# Altium PCB 1700-0003_PowerBoard_REV-A.PcbDoc (part 1 of 2)
Units mil, origin at the board's own origin, x right, y up, seen from the top; angles counter-clockwise.
Board outline 4000 x 3250 mil, 4 copper layers (Top, GND+Signal, PWR+Signal, Bottom), stack 69.687 mil thick; 205 components, 103 nets, 571 pads, 228 vias.
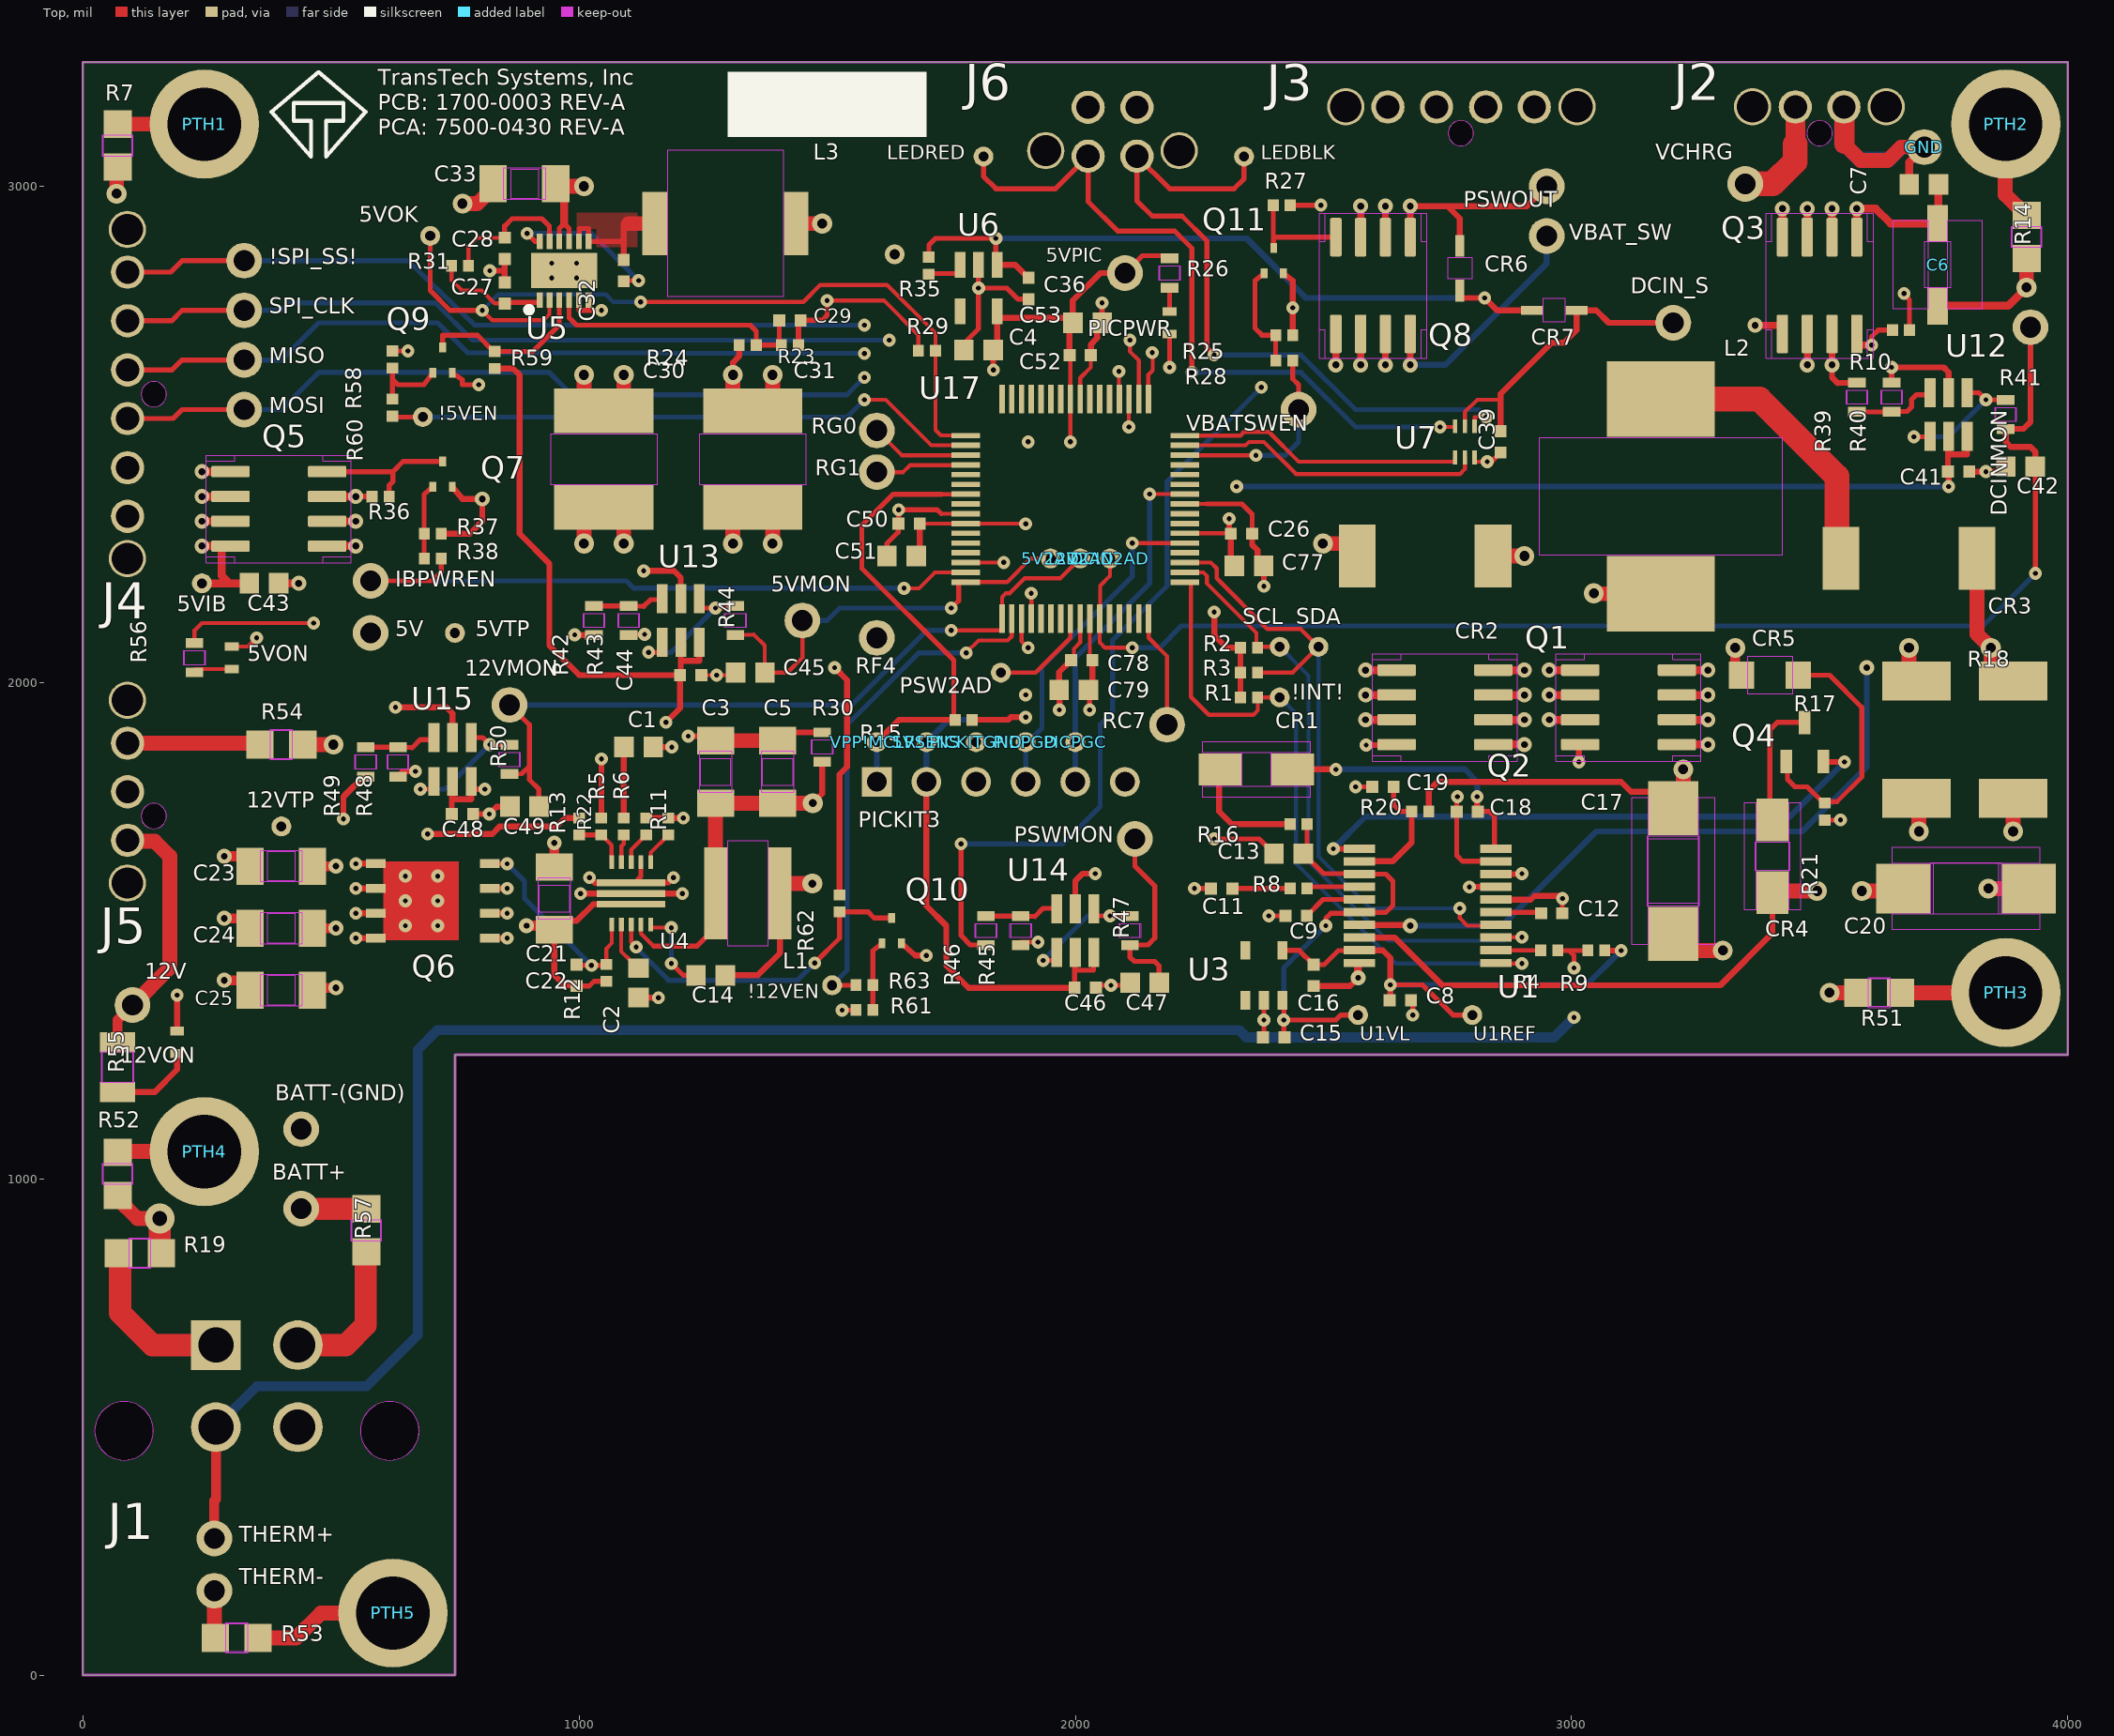
[diagram p0: Top view]
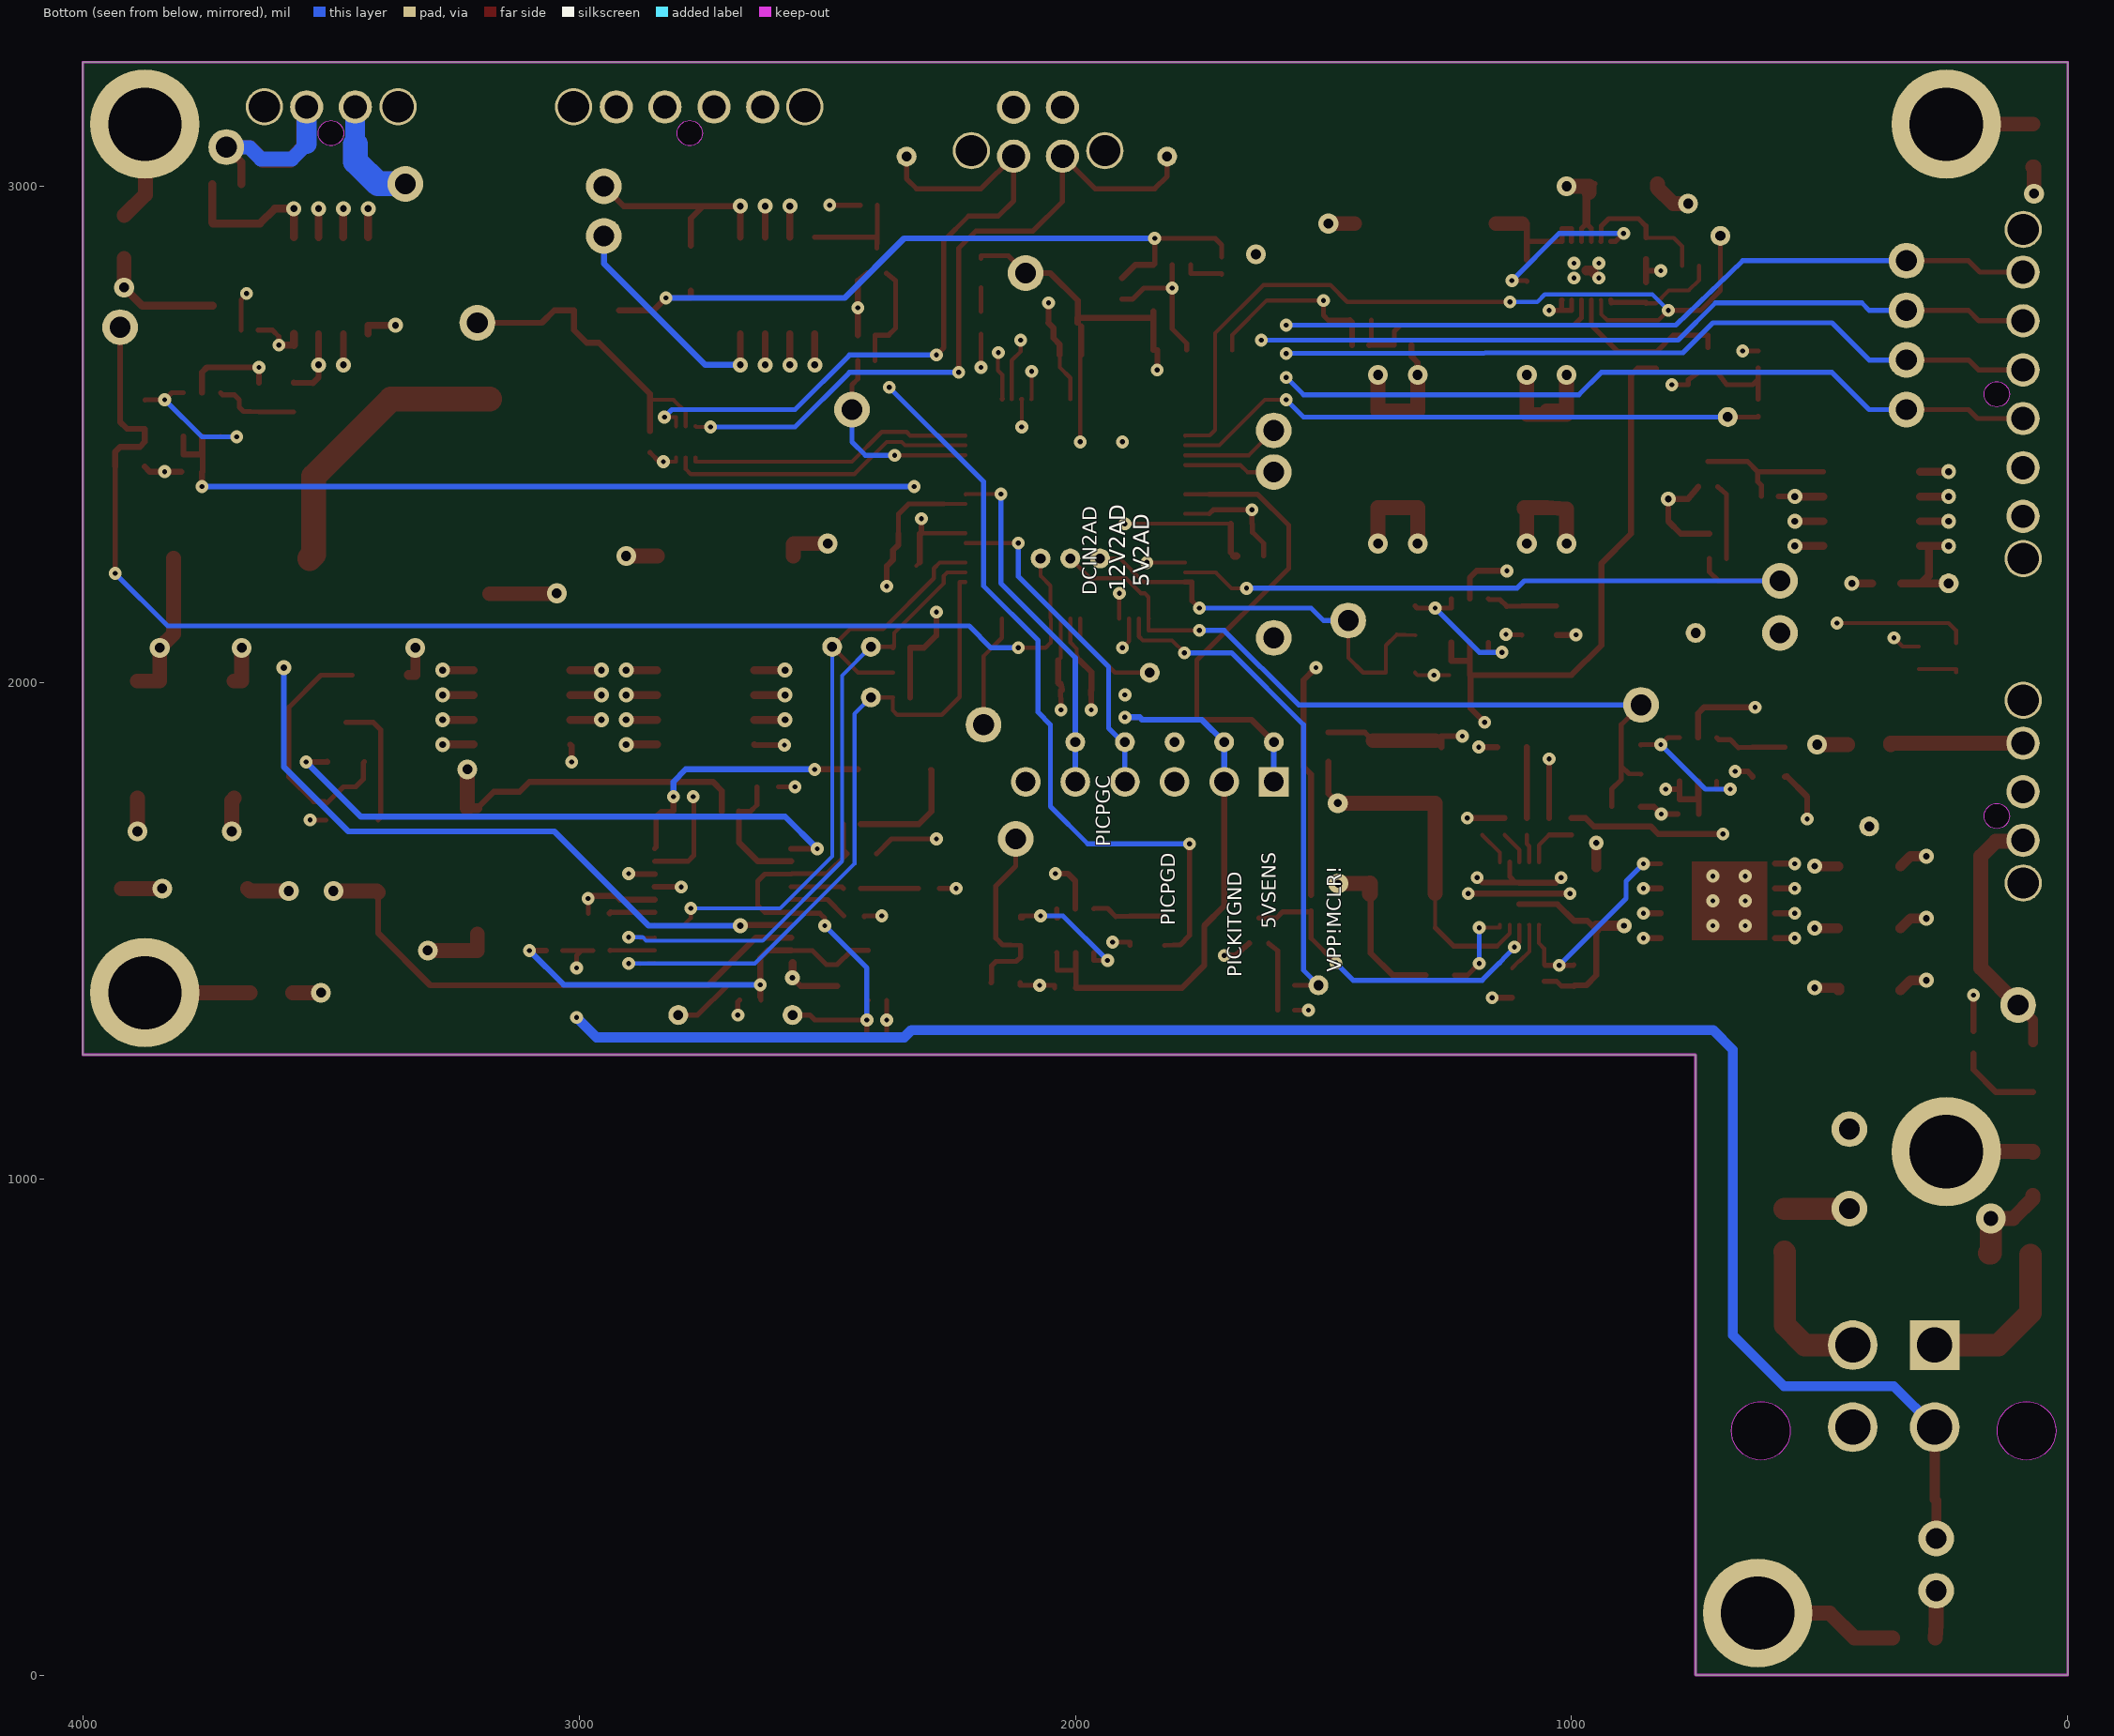
[diagram p1: Bottom view, seen from below]
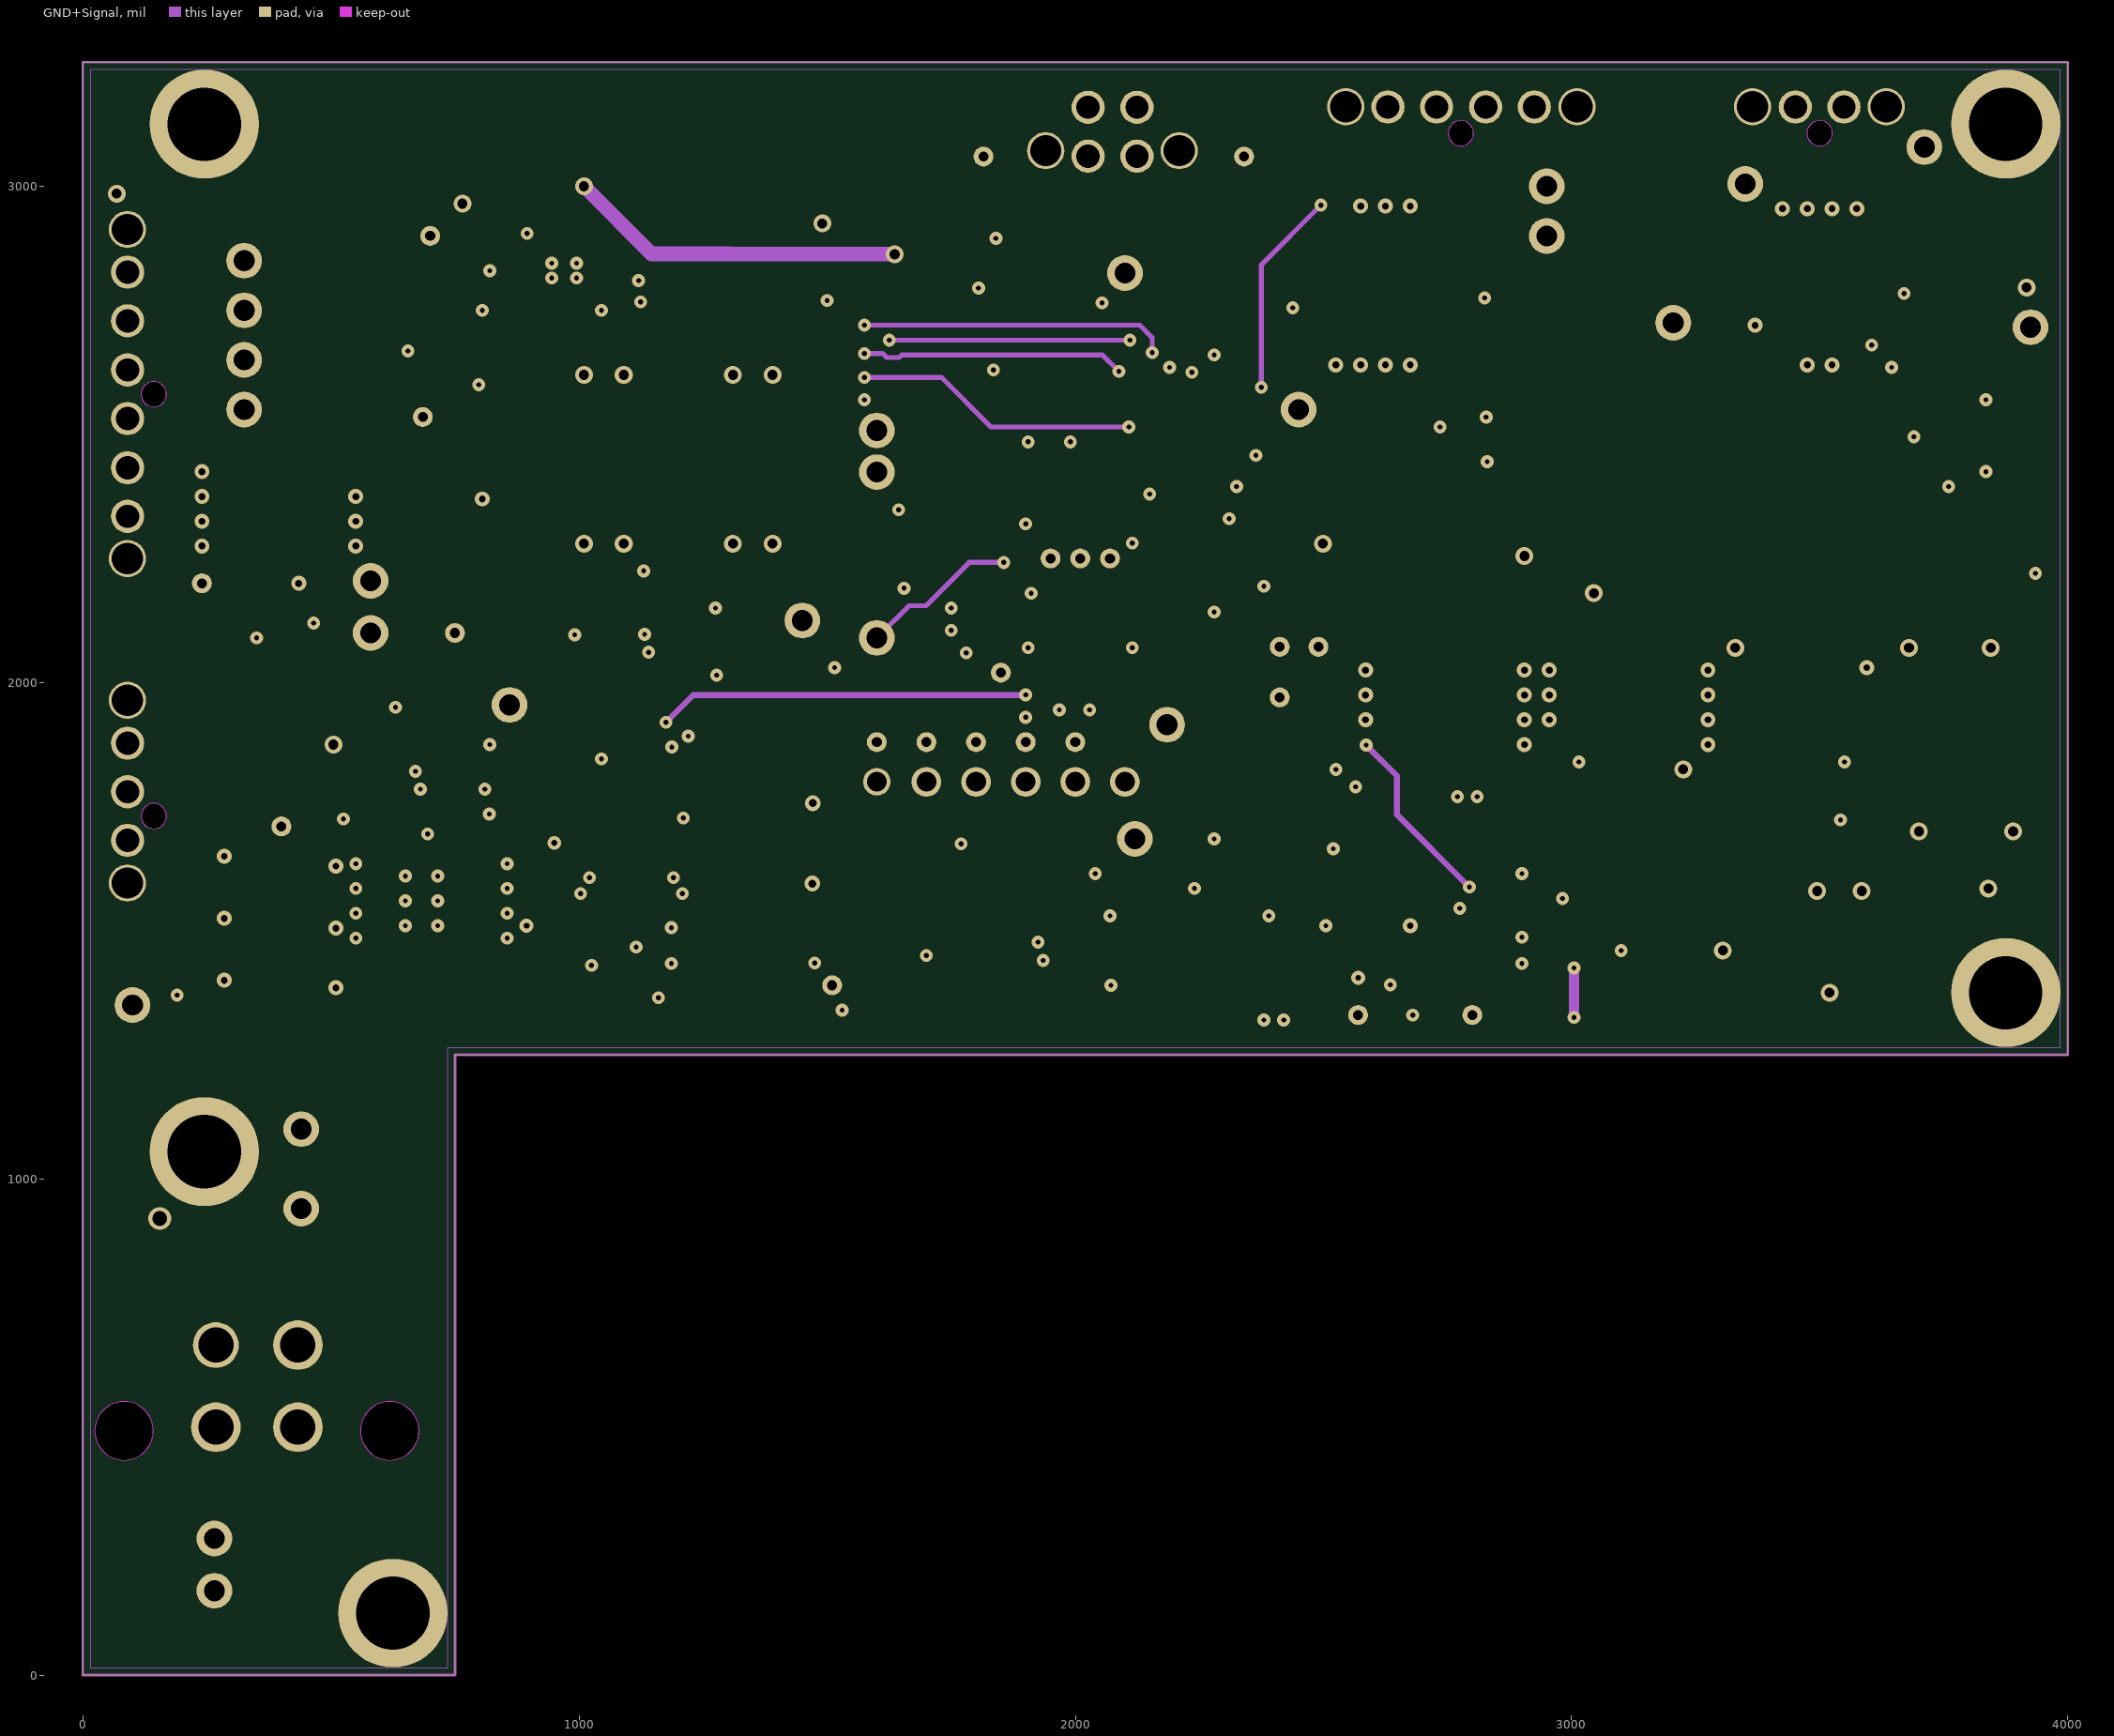
[diagram p2: GND+Signal]
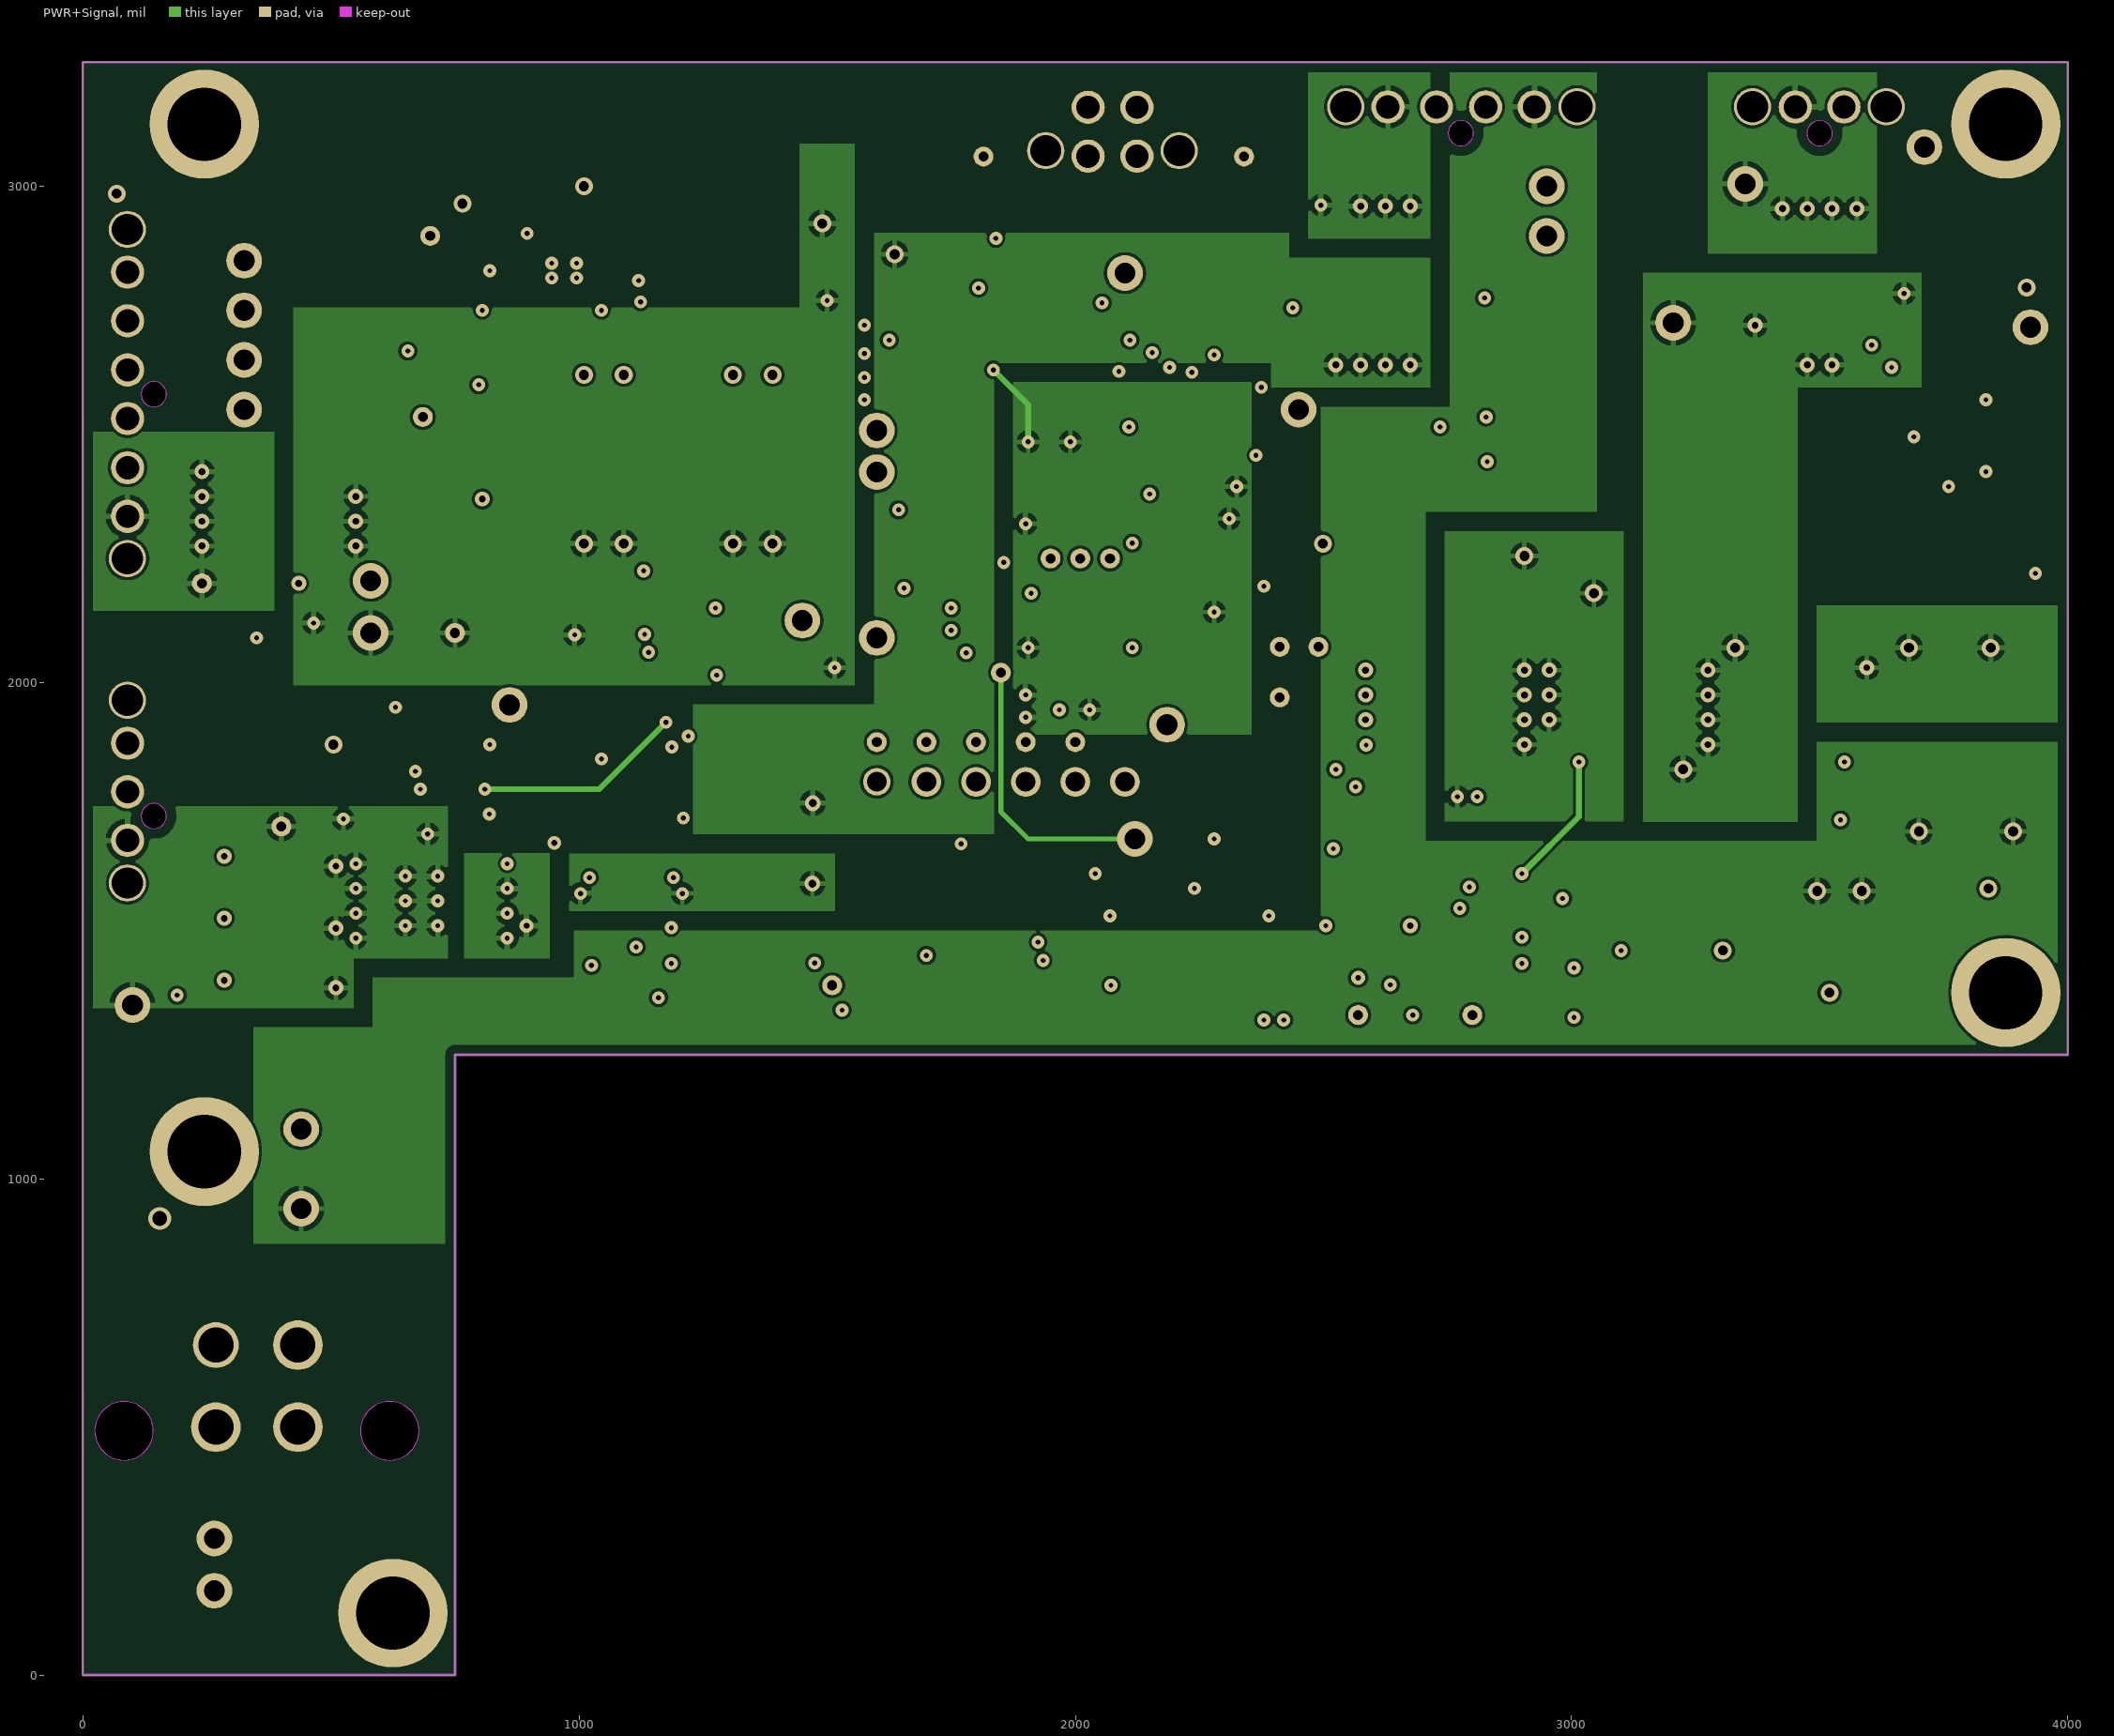
[diagram p3: PWR+Signal]

## Layer stack, top to bottom
Top Solder: solder mask 0.4, Solder Resist, Dk 3.5
Top: signal copper 1.378
Dielectric 1: core 4.3307, FR-4, Dk 4.8
GND+Signal: signal copper 1.378
Dielectric2: prepreg 47.2441, FR-4, Dk 4.8
PWR+Signal: signal copper 1.378
Dielectric3: dielectric 12.6, FR-4, Dk 4.8
Bottom: signal copper 1.378
Bottom Solder: solder mask 0.4, Solder Resist, Dk 3.5

## Board outline
0,0 750,0 750,1250 4000,1250 4000,3250 0,3250
cut-out: 82.96,433.07 ccw(c82.96,492.13) 142.01,492.13 ccw(c82.96,492.13) 82.96,551.18 ccw(c82.96,492.13) 23.91,492.13 ccw(c82.96,492.13)
cut-out: 618.39,433.07 ccw(c618.39,492.13) 677.45,492.13 ccw(c618.39,492.13) 618.39,551.18 ccw(c618.39,492.13) 559.34,492.13 ccw(c618.39,492.13)
cut-out: 143,1705.5 ccw(c143,1731) 168.5,1731 ccw(c143,1731) 143,1756.5 ccw(c143,1731) 117.5,1731 ccw(c143,1731)
cut-out: 2777,3081.5 ccw(c2777,3107) 2802.5,3107 ccw(c2777,3107) 2777,3132.5 ccw(c2777,3107) 2751.5,3107 ccw(c2777,3107)
cut-out: 143,2555.5 ccw(c143,2581) 168.5,2581 ccw(c143,2581) 143,2606.5 ccw(c143,2581) 117.5,2581 ccw(c143,2581)
cut-out: 3500,3081.5 ccw(c3500,3107) 3525.5,3107 ccw(c3500,3107) 3500,3132.5 ccw(c3500,3107) 3474.5,3107 ccw(c3500,3107)

## Design rules (kind name [scope] priority, off if disabled: settings)
BoardOutlineClearance mdCopperDimension [All] p1: gap=10 ignorepadtopadclearanceinfootprint=FALSE except(0: Arc-SplitContinuation Track-SplitContinuation SMDPad-SplitContinuation THPad-SplitContinuation Via-SplitContinuation Fill-SplitContinuation Poly-SplitContinuation Region-SplitContinuation Text-SplitContinuation; 20: Poly-OutlineEdge Poly-CavityEdge Poly-CutoutEdge Poly-SplitBarrior)
Clearance Clearance_for_PolygonClass_Isolate_2 [InPolygonClass('Isolate_2') vs IsArc Or IsTrack Or IsPad Or IsVia Or IsFill Or IsRegion Or IsText] p1: gap=2 ignorepadtopadclearanceinfootprint=FALSE
Clearance "Clearance (Same Net)" [All] p2: gap=6 ignorepadtopadclearanceinfootprint=FALSE
Clearance [All] p3: gap=6 ignorepadtopadclearanceinfootprint=FALSE
HoleSize [All] p1: absolutevalues=TRUE maxlimit=100000 minlimit=8 maxpercent=80.000 minpercent=20.000
HoleToHoleClearance mdDrill [All] p1: gap=10 allowstackedmicrovias=TRUE
MinimumSolderMaskSliver [All] p1 off: minsoldermaskwidth=10
PasteMaskExpansion Expansion_SMDPaste_OFF [InPadClass('SMDPaste_OFF')] p1: expansion=0
PasteMaskExpansion mlMinCreamFrame [All] p2: expansion=0
PolygonConnect PolygonConnect_For_PolygonThermal_ON_Width110000_Gap100000 [InPolygonClass('PolygonThermal_ON_Width110000_Gap100000')] p1: connectstyle=Relief reliefconductorwidth=11 reliefentries=4 polygonreliefangle="90 Angle" airgapwidth=10
PolygonConnect PolygonConnect_For_PolygonThermal_ON_Width120000_Gap100000 [InPolygonClass('PolygonThermal_ON_Width120000_Gap100000')] p2: connectstyle=Relief reliefconductorwidth=12 reliefentries=4 polygonreliefangle="90 Angle" airgapwidth=10
PolygonConnect PolygonConnect_For_PolygonThermal_ON_Width40000_Gap100000 [InPolygonClass('PolygonThermal_ON_Width40000_Gap100000')] p3: connectstyle=Relief reliefconductorwidth=4 reliefentries=4 polygonreliefangle="90 Angle" airgapwidth=10
PolygonConnect PolygonConnect_For_PolygonThermal_ON_Width100000_Gap100000 [InPolygonClass('PolygonThermal_ON_Width100000_Gap100000')] p4: connectstyle=Relief reliefconductorwidth=10 reliefentries=4 polygonreliefangle="90 Angle" airgapwidth=10
PolygonConnect ThermalVias [IsVia] p5: connectstyle=Relief reliefconductorwidth=10 reliefentries=4 polygonreliefangle="90 Angle" airgapwidth=10
PolygonConnect [All] p6: connectstyle=Relief reliefconductorwidth=10 reliefentries=4 polygonreliefangle="90 Angle" airgapwidth=10
RoutingVias [All] p1: holewidth=8 width=24 viastyle="Through Hole" minholewidth=8 minwidth=24 maxholewidth=100 maxwidth=100
SolderMaskExpansion mlMinStopFrame [All] p1: expansion=2 istentingtop=FALSE
Width [All] p1: maxlimit=10 minlimit=6 preferedwidth=6
26 further rules are at their usual default settings.

## Classes and differential pairs
polygon class PolygonThermal_ON_Width110000_Gap100000: Polygon_1_Net_5V Polygon_1_Net_BATT+ Polygon_1_Net_DCIN_S Polygon_1_Net_IB_PWR_5V Polygon_1_Net_PC_PWR_12V Polygon_1_Net_PSW_OUT Polygon_1_Net_U1_CS Polygon_1_Net_V_CHRGR Polygon_1_Net_VBAT_SW
polygon class PolygonThermal_ON_Width120000_Gap100000: Polygon_1_Net_VOUT_BOOST
polygon class PolygonThermal_ON_Width40000_Gap100000: Polygon_1_Net_PHASE1-2
polygon class PolygonThermal_ON_Width100000_Gap100000: Polygon_1_Net_5VPIC Polygon_1_Net_GND Polygon_1_Net_L1_OUT Polygon_1_Net_U1_LX
polygon class Isolate_2: Polygon_1_Net_GND
pad class SMDPaste_OFF: U4-6 U4-7 U4-8

## Components (designator, comment, footprint, x,y, rotation, side; value= is the part's Value field where it differs from the comment)
5V "" TST_POINT_PTH_042-OCT 580,2100 r0 top
5V2AD "" TST_POINT_PTH_20X40MIL 1950,2250 r0 top
5VIB "" TST_POINT_PTH_20X40MIL 240,2200 r0 top
5VMON "" TST_POINT_PTH_042-OCT 1450,2125 r0 top
5VOK "" TST_POINT_PTH_20X40MIL_2PIN 700,2900 r0 top
5VON "" LED_DIALIGHT_598_DIA 300,2050 r270 top
5VPIC "" TST_POINT_PTH_042-OCT 2100,2825 r0 top
5VSENS "" TST_POINT_PTH_20X40MIL_2PIN 1700,1880 r90 top
5VTP "" TST_POINT_PTH_20X40MIL 750,2100 r0 top
12V "" TST_POINT_PTH_042-OCT 100,1350 r0 top
12V2AD "" TST_POINT_PTH_20X40MIL 2010,2250 r0 top
12VMON "" TST_POINT_PTH_042-OCT 860,1955 r0 top
12VON "" LED_DIALIGHT_598_DIA 190,1275 r270 top
12VTP "" TST_POINT_PTH_20X40MIL 400,1710 r0 top
!5VEN "" TST_POINT_PTH_20X40MIL_2PIN 685,2535 r0 top
!12VEN "" TST_POINT_PTH_20X40MIL 1510,1390 r0 top
!INT! "" TST_POINT_PTH_20X40MIL_2PIN 2412,1970 r0 top
!SPI_SS! "" TST_POINT_PTH_042-OCT_2PIN 325,2850 r0 top
BATT+ "" TST_POINT_PTH_042-OCT 440,940 r0 top
BATT-(GND) "" TST_POINT_PTH_042-OCT 440,1100 r0 top
C1 "" CAP_C1608_TDK 1120,1870 r0 top
C2 "" CAP_C1608_TDK 1120,1395 r270 top
C3 "" CAP_CL31_SAM 1275,1820 r90 top
C4 "" CAP_C1608_TDK 1805,2670 r180 top
C5 "" CAP_CL31_SAM 1400,1820 r90 top
C6 "" CAP_AFK106M25B12T-F_CND-L 3738,2842 r270 top
C7 "" CAP_C1608_TDK 3710,3004 r180 top
C8 "" G-155_MUR 2655,1360 r0 top
C9 "" G-155_MUR 2445,1530 r180 top
C11 "" G-155_MUR 2295,1585 r180 top
C12 "" G-155_MUR 2960,1535 r0 top
C13 "" CAP_C1608_TDK 2430,1655 r180 top
C14 "" CAP_C1608_TDK 1265,1410 r180 top
C15 "" G-155_MUR 2400,1285 r180 top
C16 "" G-155_MUR 2480,1410 r270 top
C17 "" CAPMP7.6X4.3_3.1N_KEM 3205,1620 r270 top
C18 "" G-155_MUR 2790,1740 r180 top
C19 "" G-155_MUR 2620,1790 r180 top
C20 "" CAPMP7.6X4.3_3.1N_KEM 3795,1585 r0 top
C21 "" CAP_CL31_SAM 950,1565 r90 top
C22 "" G-155_MUR 995,1410 r90 top
C23 "" CAP_CL31_SAM 400,1630 r180 top
C24 "" CAP_CL31_SAM 400,1505 r180 top
C25 "" CAP_CL31_SAM 400,1380 r180 top
C26 "" G-155_MUR 2335,2300 r0 top
C27 "" G-155_MUR 850,2785 r90 top
C28 "" G-155_MUR 850,2875 r270 top
C29 "" G-155_MUR 1425,2730 r180 top
C30 "" CAP_CKG57N_TDK 1050,2450 r90 top
C31 "" CAP_CKG57N_TDK 1350,2450 r90 top
C32 "" G-155_MUR 1090,2830 r270 top
C33 "" CAP_CL31_SAM 890,3005 r180 top
C36 "" G-155_MUR 1906,2794 r270 top
C39 "" G-155_MUR 2857,2485 r270 top
C41 "" G-155_MUR 3780,2425 r0 top
C42 "" CAP_C1608_TDK 3905,2435 r180 top
C43 "" CAP_C1608_TDK 365,2200 r0 top
C44 "" G-155_MUR 1225,2015 r0 top
C45 "" CAP_C1608_TDK 1345,2020 r180 top
C46 "" G-155_MUR 2020,1385 r0 top
C47 "" CAP_C1608_TDK 2140,1395 r180 top
C48 "" G-155_MUR 765,1735 r0 top
C49 "" CAP_C1608_TDK 890,1750 r180 top
C50 "" G-155_MUR 1665,2320 r180 top
C51 "" CAP_C1608_TDK 1650,2255 r180 top
C52 "" G-155_MUR 2010,2660 r0 top
C53 "" CAP_C1608_TDK 2025,2725 r0 top
C77 "" CAP_C1608_TDK 2350,2235 r0 top
C78 "" G-155_MUR 2013,2045 r180 top
C79 "" CAP_C1608_TDK 1997,1985 r180 top
CR1 "" SMA_DIO 2365,1825 r180 top
CR2 "" CR_0CQ-13-F_DIO 2705,2255 r0 top
CR3 "" CR_0CQ-13-F_DIO 3680,2250 r0 top
CR4 "" SMA_DIO 3405,1650 r90 top
CR5 "" DIO_BZD27C4V3P_VIS 3400,2015 r180 top
CR6 "" USC_TOS 2775,2835 r90 top
CR7 "" USC_TOS 2965,2750 r0 top
DCIN2AD "" TST_POINT_PTH_20X40MIL 2070,2250 r0 top
DCIN_S "" TST_POINT_PTH_042-OCT 3205,2725 r0 top
DCINMON "" TST_POINT_PTH_042-OCT 3925,2716 r0 top
GND "" TST_POINT_PTH_042-OCT 3711,3079 r0 top
IBPWREN "" TST_POINT_PTH_042-OCT 580,2205 r0 top
J1 "" MOLEX_462075004 268,665 r180 top
J2 "" CON_1053111302_MOL 3500,3160 r0 top
J3 "" CON_1053111304_MOL 2630,3160 r0 top
J4 "" CON_1053111206_MOL 90,2335 r90 top
J5 "" CON_1053111303_MOL 90,1780 r90 top
J6 "" CON_1053121304 2075,3110 r0 top
L1 "" IND_XAL50XX_COC 1340,1575 r180 top
L2 "" DR127 3180,2375 r90 top
L3 "" IND_CB_DRA74 1295,2925 r180 top
LEDBLK "" TST_POINT_PTH_20X40MIL 2340,3060 r0 top
LEDRED "" TST_POINT_PTH_20X40MIL 1815,3060 r0 top
MISO "" TST_POINT_PTH_042-OCT_2PIN 325,2650 r0 top
MOSI "" TST_POINT_PTH_042-OCT_2PIN 325,2550 r0 top
PICKIT3 "" CON6_1X6_VERT-HDR 1850,1800 r0 top
PICKITGND "" TST_POINT_PTH_20X40MIL_2PIN 1800,1880 r90 top
PICPGC "" TST_POINT_PTH_20X40MIL_2PIN 2000,1880 r90 top
PICPGD "" TST_POINT_PTH_20X40MIL_2PIN 1900,1880 r90 top
PICPWR "" LED_DIALIGHT_598_DIA 2190,2725 r90 top
PSW2AD "" TST_POINT_PTH_20X40MIL 1850,2020 r0 top
PSWMON "" TST_POINT_PTH_042-OCT 2120,1685 r0 top
PSWOUT "" TST_POINT_PTH_042-OCT 2950,3000 r180 top
PTH1 "" PTH_4-40 245,3125 r0 top
PTH2 "" PTH_4-40 3875,3125 r0 top
PTH3 "" PTH_4-40 3875,1375 r0 top
PTH4 "" PTH_4-40 245,1055 r0 top
PTH5 "" PTH_4-40 625,125 r0 top
Q1 "" SOIC127P600X175-8N 3115,1950 r0 top
Q2 "" SOIC127P600X175-8N 2745,1950 r0 top
Q3 "" SOIC127P600X175-8N 3500,2800 r90 top
Q4 "" SOT-23-3_DIOTEC 3470,1880 r0 top
Q5 "" SOIC127P600X175-8N 395,2350 r180 top
Q6 "" SON8_SI7135DP-T1-GE3_VIS 705,1560 r180 top
Q7 "" SC-75(SOT-416)_ONSEMI 725,2420 r0 top
Q8 "" SOIC127P600X175-8N 2600,2800 r270 top
Q9 "" SC-75(SOT-416)_ONSEMI 725,2650 r0 top
Q10 "" SC-75(SOT-416)_ONSEMI 1630,1500 r0 top
Q11 "" SC-75(SOT-416)_ONSEMI 2400,2850 r0 top
R1 "" RESC1005X35N 2350,1970 r0 top
R2 "" RESC1005X35N 2350,2070 r0 top
R3 "" RESC1005X35N 2350,2020 r0 top
R4 "" RESC1005X35N 2955,1460 r180 top
R5 "" RESC1005X35N 1090,1710 r90 top
R6 "" RESC1005X35N 1135,1710 r90 top
R7 "" STA_HCJ0805_STP 70,3082 r270 top
R8 "" RESC1005X35N 2450,1585 r0 top
R9 "" RESC1005X35N 3050,1460 r180 top
R10 "" RESC1005X35N 3664,2710 r0 top
R11 "" RESC1005X35N 1180,1710 r90 top
R12 "" RESC1005X35N 1055,1415 r90 top
R13 "" RESC1005X35N 1000,1710 r270 top
R14 "" STA_HCJ0805_STP 3917,2898 r270 top
R15 "" RESC1005X35N 1775,1925 r180 top
R16 "" RESC1005X35N 2450,1715 r180 top
R17 "" RES_2512_TECONN 3695,1885 r270 top
R18 "" RES_2512_TECONN 3890,1885 r270 top
R19 "" STA_HCJ0805_STP 115,850 r180 top
R20 "" RESC1005X35N 2695,1740 r0 top
R21 "" RESC1005X35N 3510,1740 r270 top
R22 "" RESC1005X35N 1045,1710 r90 top
R23 "" RESC1005X35N 1425,2680 r180 top
R24 "" RESC1005X35N 1340,2680 r180 top
R25 "" RESC1005X35N 2421,2700 r180 top
R26 "" STA_RMCF0603_STP 2190,2825 r90 top
R27 "" RESC1005X35N 2416,2962 r0 top
R28 "" RESC1005X35N 2421,2649 r180 top
R29 "" RESC1005X35N 1701,2669 r0 top
R30 "" STA_RMCF0603_STP 1490,1870 r90 top
R31 "" RESC1005X35N 760,2840 r180 top
R35 "" RESC1005X35N 1705,2840 r90 top
R36 "" RESC1005X35N 600,2375 r180 top
R37 "" RESC1005X35N 705,2300 r180 top
R38 "" RESC1005X35N 705,2250 r180 top
R39 "" STA_RMCF0603_STP 3575,2575 r270 top
R40 "" STA_RMCF0603_STP 3645,2575 r90 top
R41 "" STA_RMCF0603_STP 3875,2540 r270 top
R42 "" STA_RMCF0603_STP 1030,2125 r90 top
R43 "" STA_RMCF0603_STP 1100,2125 r270 top
R44 "" STA_RMCF0603_STP 1315,2125 r270 top
R45 "" STA_RMCF0603_STP 1890,1500 r270 top
R46 "" STA_RMCF0603_STP 1820,1500 r90 top
R47 "" STA_RMCF0603_STP 2110,1500 r270 top
R48 "" STA_RMCF0603_STP 635,1840 r270 top
R49 "" STA_RMCF0603_STP 570,1840 r90 top
R50 "" STA_RMCF0603_STP 860,1845 r270 top
R51 "" STA_HCJ0805_STP 3620,1375 r180 top
R52 "" STA_HCJ0805_STP 70,1010 r270 top
R53 "" STA_HCJ0805_STP 310,75 r180 top
R54 "" STA_HCJ0805_STP 400,1875 r0 top
R55 "" RC1206N_YAG 70,1225 r270 top
R56 "" STA_RMCF0603_STP 225,2050 r90 top
R57 "" STA_HCJ0805_STP 571,896 r270 top
R58 "" RESC1005X35N 624,2651 r270 top
R59 "" RESC1005X35N 830,2650 r270 top
R60 "" RESC1005X35N 624,2554 r90 top
R61 "" RESC1005X35N 1575,1340 r0 top
R62 "" RESC1005X35N 1525,1555 r90 top
R63 "" RESC1005X35N 1575,1390 r0 top
RC7 "" TST_POINT_PTH_042-OCT 2185,1915 r0 top
RF4 "" TST_POINT_PTH_042-OCT 1600,2090 r0 top
RG0 "" TST_POINT_PTH_042-OCT 1600,2508 r0 top
RG1 "" TST_POINT_PTH_042-OCT 1600,2424 r0 top
SCL "" TST_POINT_PTH_20X40MIL_2PIN 2412,2072 r0 top
SDA "" TST_POINT_PTH_20X40MIL_2PIN 2490,2072 r0 top
SPI_CLK "" TST_POINT_PTH_042-OCT_2PIN 325,2750 r0 top
THERM+ "" TST_POINT_PTH_042-OCT 265,275 r0 top
THERM- "" TST_POINT_PTH_042-OCT 265,170 r0 top
U1 "" 21-0056C_20_MXM 2710,1550 r0 top
U1REF "" TST_POINT_PTH_20X40MIL 2800,1330 r0 top
U1VL "" TST_POINT_PTH_20X40MIL 2570,1330 r0 top
U3 "" UJ_5_ADI 2380,1410 r90 top
U4 "" RNW0013A 1105,1575 r270 top
U5 "" SON50P300X400X90-13N 970,2830 r90 top
U6 "" SOT23-5L_STM 1805,2795 r270 top
U7 "" SOT5X3-6_DRL_TEX 2785,2485 r90 top
U12 "" DBV6 3760,2540 r270 top
U13 "" DBV6 1205,2125 r270 top
U14 "" DBV6 2000,1500 r270 top
U15 "" DBV6 745,1845 r270 top
U17 "" TQFP64_10X10MC_MCH 2000,2350 r0 top
VBAT_SW "" TST_POINT_PTH_042-OCT 2950,2900 r0 top
VBATSWEN "" TST_POINT_PTH_042-OCT 2450,2550 r180 top
VCHRG "" TST_POINT_PTH_042-OCT 3350,3005 r0 top
VPP!MCLR! "" TST_POINT_PTH_20X40MIL_2PIN 1600,1880 r90 top

## Footprints (in the part's own frame and the unit in brackets; to place one, negate y for a bottom-side part, rotate by r counter-clockwise, add the part's x,y. Pads: shape width x height; smd on the part's side, far side on the other; paste and mask are expansions set on the pad)
21-0056C_20_MXM [mil] "21-0056C_20_MXM"
  rect 63.5x17 smd: 1(-137.75,115.16) 2(-137.75,89.57) 3(-137.75,63.98) 4(-137.75,38.39) 5(-137.75,12.8) 6(-137.75,-12.8) 7(-137.75,-38.39) 8(-137.75,-63.98) 9(-137.75,-89.57) 10(-137.75,-115.16) 11(137.75,-115.16) 12(137.75,-89.57) 13(137.75,-63.98) 14(137.75,-38.39) 15(137.75,-12.8) 16(137.75,12.8) 17(137.75,38.39) 18(137.75,63.98) 19(137.75,89.57) 20(137.75,115.16)
CAP_AFK106M25B12T-F_CND-L [mil] "CAP_AFK106M25B12T-F_CND-L"
  rect 75x42 smd: 1(-83,0) 2(83,0)
  Top keep-out region: -46.5,26 46.5,26 46.5,-26 -46.5,-26
  Top keep-out region: -89.5,-20 89.5,-20 89.5,-89.5 -89.5,-89.5
  Top keep-out region: -89.5,89.5 89.5,89.5 89.5,20 -89.5,20
  Top keep-out region: -46.5,26 46.5,26 46.5,-26 -46.5,-26
CAP_C1608_TDK [mm] "CAP_C1608_TDK"
  rect 1x1.05 smd: 1(-0.75,0) 2(0.75,0)
CAP_CKG57N_TDK [mil] "CAP_CKG57N_TDK"
  rect 90x200 smd: 1(-97.5,0) 2(97.5,0)
  Top keep-out region: -51.5,107 51.5,107 51.5,-107 -51.5,-107
  Top keep-out region: -51.5,107 51.5,107 51.5,-107 -51.5,-107
CAP_CL31_SAM [mil] "CAP_CL31_SAM"
  rect 55.12x74.8 smd: 1(-62.99,0) 2(62.99,0)
  Top keep-out region: -27.63,30 27.24,30 27.24,-30 -27.63,-30
  Top keep-out region: -41.81,32 41.81,32 41.81,-32 -41.81,-32
CAPMP7.6X4.3_3.1N_KEM [mil] "CAPMP7.6X4.3_3.1N_KEM"
  rect 109.06x100.39 smd: 1(-126.77,0) 2(126.77,0)
  Top keep-out region: -148.11,-50.71 148.11,-50.71 148.11,-83.15 -148.11,-83.15
  Top keep-out region: -148.11,83.15 148.11,83.15 148.11,50.71 -148.11,50.71
  Top keep-out region: -65.11,51.71 65.11,51.71 65.11,-51.71 -65.11,-51.71
  Top keep-out region: -65.11,51.71 65.11,51.71 65.11,-51.71 -65.11,-51.71
  Top keep-out region: -148.11,-50.71 148.11,-50.71 148.11,-83.15 -148.11,-83.15
  Top keep-out region: -148.11,83.15 148.11,83.15 148.11,50.71 -148.11,50.71
  Top keep-out region: -71.02,51.71 71.02,51.71 71.02,-51.71 -71.02,-51.71
  Top keep-out region: -65.11,51.71 65.11,51.71 65.11,-51.71 -65.11,-51.71
  Top keep-out region: -148.11,-50.71 148.11,-50.71 148.11,-83.15 -148.11,-83.15
  Top keep-out region: -148.11,83.15 148.11,83.15 148.11,50.71 -148.11,50.71
  Top keep-out region: -65.11,51.71 65.11,51.71 65.11,-51.71 -65.11,-51.71
  Top keep-out region: -65.11,51.71 65.11,51.71 65.11,-51.71 -65.11,-51.71
  Top keep-out region: -148.11,-50.71 148.11,-50.71 148.11,-83.15 -148.11,-83.15
  Top keep-out region: -148.11,83.15 148.11,83.15 148.11,50.71 -148.11,50.71
  Top keep-out region: -65.11,51.71 65.11,51.71 65.11,-51.71 -65.11,-51.71
  Top keep-out region: -65.11,51.71 65.11,51.71 65.11,-51.71 -65.11,-51.71
CON6_1X6_VERT-HDR [mil] "CON6_1X6_VERT-HDR"
  rect 60x60 / inner round 55.43 / far side rect 60x60 hole 40: 1(-250,0)
  round 60 hole 40: 2(-150,0) 3(-50,0) 4(50,0) 5(150,0) 6(250,0)
CON_1053111206_MOL [mil] "CON_1053111206_MOL"
  round 67 hole 47: 1(0,0) 2(98,0) 3(197,0) 4(295,0) 5(394,0) 6(492,0)
  round 75 hole 63: P1(-85,0) P2(578,0)
CON_1053111302_MOL [mil] "CON_1053111302_MOL"
  round 67 hole 47: 1(-49,0) 2(49,0)
  round 75 hole 63: P1(-135,0) P2(134,0)
CON_1053111303_MOL [mil] "CON_1053111303_MOL"
  round 67 hole 47: 1(-98,0) 2(0,0) 3(98,0)
  round 75 hole 63: P1(-184,0) P2(184,0)
CON_1053111304_MOL [mil] "CON_1053111304_MOL"
  round 67 hole 47: 1(0,0) 2(98,0) 3(197,0) 4(295,0)
  round 75 hole 63: P1(-85,0) P2(381,0)
CON_1053121304 [mil] "CON_1053121304"
  round 67 hole 47: 1(-49.21,-49.21) 2(49.21,-49.21) 3(-49.21,49.21) 4(49.21,49.21)
  round 75 hole 63: P1(-134.65,-38.21) P2(134.65,-38.21)
CR_0CQ-13-F_DIO [mil] "CR_0CQ-13-F_DIO"
  rect 74x127 smd: 1(-137,0) 2(137,0)
DBV6 [mil] "DBV6"
  rect 58x22 smd: 1(-44,37.4) 2(-44,0) 3(-44,-37.4) 4(44,-37.4) 5(44,0) 6(44,37.4)
DIO_BZD27C4V3P_VIS [mil] "DIO_BZD27C4V3P_VIS"
  rect 51.18x55.12 smd: 1(-57.09,0) 2(57.09,0)
  Top keep-out region: -45,38.5 45,38.5 45,-38.5 -45,-38.5
  Top keep-out region: -45,38.5 45,38.5 45,-38.5 -45,-38.5
DR127 [mil] "DR127"
  rect 152x217 smd: 1(-196,0) 2(196,0)
  Top keep-out region: -118.5,244.5 118.5,244.5 118.5,-244.5 -118.5,-244.5
G-155_MUR [mm] "G-155_MUR"
  rect 0.62x0.62 smd: 1(-0.546,0) 2(0.546,0)
IND_CB_DRA74 [mil] "IND_CB_DRA74"
  rect 49.5x128 smd: 1(-142.75,0) 2(142.75,0)
  Top keep-out region: -116.5,148 116.5,148 116.5,-148 -116.5,-148
IND_XAL50XX_COC [mil] "IND_XAL50XX_COC"
  rect 46x185 smd: 1(-65,0) 2(65,0)
  Top keep-out region: -40.5,106.5 40.5,106.5 40.5,-106.5 -40.5,-106.5
LED_DIALIGHT_598_DIA [mil] "LED_DIALIGHT_598_DIA"
  rect 17.5x28 smd: 1(-22.75,0) 2(22.75,0)
MOLEX_462075004 [mil] "MOLEX_462075004"
  rect 100x100 / inner round 92.39 / far side rect 100x100 hole 70.87: 1(0,0)
  round 100 hole 70.87: 2(-165.35,0) 3(0,165.35) 4(-165.35,165.35)
PTH_4-40 [mil] "PTH_4-40"
  round 220 hole 148: P$1(0,0)
RC1206N_YAG [mil] "RC1206N_YAG"
  rect 41x71 smd: 1(-50,0) 2(50,0)
  Top keep-out region: -31.5,30 31.5,30 31.5,-30 -31.5,-30
  Top keep-out region: -31.5,32 31.5,32 31.5,-32 -31.5,-32
RES_2512_TECONN [mm] "RES_2512_TECONN"
  rect 2x3.5 smd: 1(-3,0) 2(3,0)
RESC1005X35N [mil] "RESC1005X35N"
  rect 22.05x23.62 smd: 1(-17.13,0) 2(17.13,0)
RNW0013A [mm] "RNW0013A"
  rect 0.7x0.25 smd: 1(-1.6,1) 2(-1.6,0.5) 3(-1.6,0) 4(-1.6,-0.5) 5(-1.6,-1) 9(1.6,-1) 10(1.6,-0.5) 11(1.6,0) 12(1.6,0.5) 13(1.6,1)
  rect 0.35x3.5 smd paste+0: 6(-0.55,0) 7(0,0) 8(0.55,0)
SC-75(SOT-416)_ONSEMI [mil] "SC-75(SOT-416)_ONSEMI"
  rect 14x20 smd: 1(-19.5,-25.5) 2(19.5,-25.5) 3(0,25.5)
SMA_DIO [mil] "SMA_DIO"
  rect 85.84x64.17 smd: 1(-73.12,0) 2(73.12,0)
  Top keep-out region: -108.54,-33.59 108.54,-33.59 108.54,-55.98 -108.54,-55.98
  Top keep-out region: -108.54,55.98 108.54,55.98 108.54,33.59 -108.54,33.59
  Top keep-out region: -28.7,34.59 28.7,34.59 28.7,-34.59 -28.7,-34.59
  Top keep-out region: -28.7,34.59 28.7,34.59 28.7,-34.59 -28.7,-34.59
SOIC127P600X175-8N [mil] "SOIC127P600X175-8N"
  rrect25% 77.56x23.23 smd: 1(-97.44,75) 2(-97.44,25) 3(-97.44,-25) 4(-97.44,-75) 5(97.44,-75) 6(97.44,-25) 7(97.44,25) 8(97.44,75)
  Top keep-out lines w1.97: -146.06,-96.85 -146.06,96.85 ; -146.06,-96.85 -88.58,-96.85 -88.58,-108.27 ; -146.06,-96.85 -146.06,-108.27 -88.58,-108.27 ; -146.06,96.85 -88.58,96.85 -88.58,108.27 ; -146.06,96.85 -146.06,108.27 -88.58,108.27 ; -88.58,-108.27 88.58,-108.27 ; -88.58,108.27 88.58,108.27 ; 88.58,-108.27 88.58,-96.85 146.06,-96.85 ; 88.58,-108.27 146.06,-108.27 146.06,-96.85 ; 88.58,108.27 88.58,96.85 146.06,96.85 ; 88.58,108.27 146.06,108.27 146.06,96.85 ; 146.06,-96.85 146.06,96.85
SON8_SI7135DP-T1-GE3_VIS [mil] "SON8_SI7135DP-T1-GE3_VIS"
  rect 40x18 smd: 1(-115,75) 2(-115,25) 3(-115,-25) 4(-115,-75) 5(115,-75) 6(115,-25) 7(115,25) 8(115,75)
  Top region: 99.5,79 99.5,-79 -52.5,-79 -52.5,79
SON50P300X400X90-13N [mil] "SON50P300X400X90-13N"
  rect 31.5x11.81 smd: 1(-59.06,49.21) 2(-59.06,29.53) 3(-59.06,9.84) 4(-59.06,-9.84) 5(-59.06,-29.53) 6(-59.06,-49.21) 7(59.06,-49.21) 8(59.06,-29.53) 9(59.06,-9.84) 10(59.06,9.84) 11(59.06,29.53) 12(59.06,49.21)
  rect 70.87x133.86 smd: 13(0,0)
  silkscreen extent -85,65 -73,77
SOT5X3-6_DRL_TEX [mil] "SOT5X3-6_DRL_TEX"
  rect 28x9 smd: 1(-31.5,19.69) 2(-31.5,0) 3(-31.5,-19.69) 4(31.5,-19.69) 5(31.5,0) 6(31.5,19.69)
SOT23-5L_STM [mil] "SOT23-5L_STM"
  rect 52x22 smd: 1(-47,37.4) 2(-47,0) 3(-47,-37.4) 4(47,-37.4) 5(47,37.4)
SOT-23-3_DIOTEC [mm] "SOT-23-3_DIOTEC"
  rect 0.6x1.2 smd: 1(-0.95,-1) 2(0.95,-1) 3(0,1)
STA_HCJ0805_STP [mil] "STA_HCJ0805_STP"
  rect 55.12x56.69 smd: 1(-43.31,0) 2(43.31,0)
  Top keep-out region: -21.5,28.5 21.5,28.5 21.5,-28.5 -21.5,-28.5
  Top keep-out region: -21.5,30.5 21.5,30.5 21.5,-30.5 -21.5,-30.5
STA_RMCF0603_STP [mil] "STA_RMCF0603_STP"
  rect 19.69x35.43 smd: 1(-29.53,0) 2(29.53,0)
  Top keep-out region: -14.5,19.5 14.5,19.5 14.5,-19.5 -14.5,-19.5
  Top keep-out region: -14.5,21.5 14.5,21.5 14.5,-21.5 -14.5,-21.5
TQFP64_10X10MC_MCH [mil] "TQFP64_10X10MC_MCH"
  rect 57.56x11 smd: 1(-221,147.64) 2(-221,127.95) 3(-221,108.27) 4(-221,88.58) 5(-221,68.9) 6(-221,49.21) 7(-221,29.53) 8(-221,9.84) 9(-221,-9.84) 10(-221,-29.53) 11(-221,-49.21) 12(-221,-68.9) 13(-221,-88.58) 14(-221,-108.27) 15(-221,-127.95) 16(-221,-147.64) 33(221,-147.64) 34(221,-127.95) 35(221,-108.27) 36(221,-88.58) 37(221,-68.9) 38(221,-49.21) 39(221,-29.53) 40(221,-9.84) 41(221,9.84) 42(221,29.53) 43(221,49.21) 44(221,68.9) 45(221,88.58) 46(221,108.27) 47(221,127.95) 48(221,147.64)
  rect 11x57.56 smd: 17(-147.64,-221) 18(-127.95,-221) 19(-108.27,-221) 20(-88.58,-221) 21(-68.9,-221) 22(-49.21,-221) 23(-29.53,-221) 24(-9.84,-221) 25(9.84,-221) 26(29.53,-221) 27(49.21,-221) 28(68.9,-221) 29(88.58,-221) 30(108.27,-221) 31(127.95,-221) 32(147.64,-221) 49(147.64,221) 50(127.95,221) 51(108.27,221) 52(88.58,221) 53(68.9,221) 54(49.21,221) 55(29.53,221) 56(9.84,221) 57(-9.84,221) 58(-29.53,221) 59(-49.21,221) 60(-68.9,221) 61(-88.58,221) 62(-108.27,221) 63(-127.95,221) 64(-147.64,221)
TST_POINT_PTH_20X40MIL [mil] "TST_POINT_PTH_20X40MIL"
  round 40 hole 20: P$1(0,0)
TST_POINT_PTH_20X40MIL_2PIN [mil] "TST_POINT_PTH_20X40MIL_2PIN"
  round 40 hole 20: P$1(0,0) P$2(0,0)
TST_POINT_PTH_042-OCT [mil] "TST_POINT_PTH_042-OCT"
  round 72 hole 42: P$1(0,0)
TST_POINT_PTH_042-OCT_2PIN [mil] "TST_POINT_PTH_042-OCT_2PIN"
  round 72 hole 42: P$1(0,0) P$2(0,0)
UJ_5_ADI [mil] "UJ_5_ADI"
  rect 37.5x20 smd: 1(-50.25,37.4) 2(-50.25,0) 3(-50.25,-37.4) 4(50.25,-37.4) 5(50.25,37.4)
USC_TOS [mil] "USC_TOS"
  rect 43.75x17.75 smd: 1(-45.28,0) 2(45.28,0)
  Top keep-out region: -21.9,24.09 21.9,24.09 21.9,-24.09 -21.9,-24.09

## Part data
5V 5VMON 5VPIC 12V 12VMON BATT+ BATT-(GND) DCIN_S DCINMON GND IBPWREN PSWMON PSWOUT RC7 RF4 RG0 RG1 THERM+ THERM- VBAT_SW VBATSWEN VCHRG: library part TST_POINT_PTH_042-OCT, PackageName=TST_POINT_PTH_042-OCT
5V2AD 5VIB 5VTP 12V2AD 12VTP !12VEN DCIN2AD LEDBLK LEDRED PSW2AD U1REF U1VL: library part TST_POINT_PTH_20X40MIL, PackageName=TST_POINT_PTH_20X40MIL
5VOK 5VSENS !5VEN !INT! PICKITGND PICPGC PICPGD SCL SDA VPP!MCLR!: library part TST_POINT_PTH_20X40MIL_2PIN, PackageName=TST_POINT_PTH_20X40MIL_2PIN
5VON 12VON PICPWR: library part LED_DIALIGHT_598_DIA, PackageName=LED_DIALIGHT_598_DIA
!SPI_SS! MISO MOSI SPI_CLK: library part TST_POINT_PTH_042-OCT_2PIN, PackageName=TST_POINT_PTH_042-OCT_2PIN
C1 C2 C4 C7 C13 C14 C42 C43 C45 C47 C49 C51 C53 C77 C79: library part CAP_C1608_TDK, PackageName=CAP_C1608_TDK
C3 C5 C21 C23 C24 C25 C33: library part CAP_CL31_SAM, PackageName=CAP_CL31_SAM
C6: library part CAP_AFK106M25B12T-F_CND-L, PackageName=CAP_AFK106M25B12T-F_CND-L
C8 C9 C11 C12 C15 C16 C18 C19 C22 C26 C27 C28 C29 C32 C36 C39 C41 C44 C46 C48 C50 C52 C78: library part G-155_MUR, PackageName=G-155_MUR
C17 C20: library part CAPMP7.6X4.3_3.1N_KEM, PackageName=CAPMP7.6X4.3_3.1N_KEM
C30 C31: library part CAP_CKG57N_TDK, PackageName=CAP_CKG57N_TDK
CR1 CR4: library part SMA_DIO, PackageName=SMA_DIO
CR2 CR3: library part CR_0CQ-13-F_DIO, PackageName=CR_0CQ-13-F_DIO
CR5: library part DIO_BZD27C4V3P_VIS, PackageName=DIO_BZD27C4V3P_VIS
CR6 CR7: library part USC_TOS, PackageName=USC_TOS
J1: library part MOLEX_462075004, PackageName=MOLEX_462075004
J2: library part CON_1053111302_MOL, PackageName=CON_1053111302_MOL
J3: library part CON_1053111304_MOL, PackageName=CON_1053111304_MOL
J4: library part CON_1053111206_MOL, PackageName=CON_1053111206_MOL
J5: library part CON_1053111303_MOL, PackageName=CON_1053111303_MOL
J6: library part CON_1053121304, PackageName=CON_1053121304
L1: library part IND_XAL50XX_COC, PackageName=IND_XAL50XX_COC
L2: library part DR127, PackageName=DR127
L3: library part IND_CB_DRA74, PackageName=IND_CB_DRA74
PICKIT3: library part CON6_1X6_VERT-HDR, PackageName=CON6_1X6_VERT-HDR
PTH1 PTH2 PTH3 PTH4 PTH5: library part PTH_4-40, PackageName=PTH_4-40
Q1 Q2 Q3 Q5 Q8: library part SOIC127P600X175-8N, PackageName=SOIC127P600X175-8N
Q4: library part SOT-23-3_DIOTEC, PackageName=SOT-23-3_DIOTEC
Q6: library part SON8_SI7135DP-T1-GE3_VIS, PackageName=SON8_SI7135DP-T1-GE3_VIS
Q7 Q9 Q10 Q11: library part SC-75(SOT-416)_ONSEMI, PackageName=SC-75(SOT-416)_ONSEMI
R1 R2 R3 R4 R5 R6 R8 R9 R10 R11 R12 R13 R15 R16 R20 R21 R22 R23 R24 R25 R27 R28 R29 R31 R35 R36 R37 R38 R58 R59 R60 R61 R62 R63: library part RESC1005X35N, PackageName=RESC1005X35N
R7 R14 R19 R51 R52 R53 R54 R57: library part STA_HCJ0805_STP, PackageName=STA_HCJ0805_STP
R17 R18: library part RES_2512_TECONN, PackageName=RES_2512_TECONN
R26 R30 R39 R40 R41 R42 R43 R44 R45 R46 R47 R48 R49 R50 R56: library part STA_RMCF0603_STP, PackageName=STA_RMCF0603_STP
R55: library part RC1206N_YAG, PackageName=RC1206N_YAG
U1: library part 21-0056C_20_MXM, PackageName=21-0056C_20_MXM
U3: library part UJ_5_ADI, PackageName=UJ_5_ADI
U4: library part RNW0013A, PackageName=RNW0013A
U5: library part SON50P300X400X90-13N, PackageName=SON50P300X400X90-13N
U6: library part SOT23-5L_STM, PackageName=SOT23-5L_STM
U7: library part SOT5X3-6_DRL_TEX, PackageName=SOT5X3-6_DRL_TEX
U12 U13 U14 U15: library part DBV6, PackageName=DBV6
U17: library part TQFP64_10X10MC_MCH, PackageName=TQFP64_10X10MC_MCH

## Free pads (board coordinates)
  round 51 hole 51 unplated: MH1(143,1731) MH1(143,2581) MH1(2777,3107) MH1(3500,3107)
  round 118.11 hole 118.11 unplated: MH1(618.39,492.13) MH2(82.96,492.13)

## Via types
v1: diameter 26/26/26/26 (per signal layer), hole 10, Top to Bottom, 148 vias
v2: diameter 30/30/30/30 (per signal layer), hole 14, Top to Bottom, 45 vias
v3: diameter 40/36/36/40 (per signal layer), hole 20, Top to Bottom, 29 vias
v4: diameter 30/28/28/30 (per signal layer), hole 12, Top to Bottom, 3 vias
v5: diameter 40/32/32/40 (per signal layer), hole 16, Top to Bottom, 2 vias
v6: diameter 60/46/46/60 (per signal layer), hole 30, Top to Bottom, 1 vias

## Nets (pads, with @x,y where several pads share a name; then routed paths per layer and width w, separated by ;. In a path a pad name is that pad's centre, name@x,y a point inside that pad or via, vN(x,y) a via of type N, cw(c..) or ccw(c..) an arc to the next point about the centre after c; other vN are vias at no path point)
5V: 5V.P$1 5VTP.P$1 C29.1 C30.1 C31.1 L3.1 Q5.1 Q5.2 Q5.3 R23.1 R29.1 R36.2 R42.1 R56.2 R62.2 | length 1894.5
  Top w8: R56.2@225,2079.53 225,2105 240,2120 v1(465,2120) ; v1(1500,2770) 1614,2770 1683.87,2700.13 R29.1@1683.87,2669
  Top w10: C29.1@1446.5,2730 1490,2730 1500,2740 v1(1500,2770)
  Top w12: v2(550,2375) R36.2@582.87,2375 ; v1(991,2096) 1029.54,2096 ccw(c1030.04,2095.97) R42.1@1030,2095.47 ; R23.1@1442.13,2680 1442.13,2725.63 C29.1@1446.5,2730 ; v1(1515,2030) 1540,2005 1540,1830 1525,1815 R62.2@1525,1572.13
  Top w16: Q5.1@492.44,2275 v2(550,2275) ; Q5.2@492.44,2325 v2(550,2325) ; Q5.3@492.44,2375 v2(550,2375)
  Top w30: v3(1010,2280) 1010,2350 C30.1@1050,2352.5 C30.1@1082.5,2352.5 ; v3(1090,2280) 1090,2350 1095,2350 C30.1@1082.5,2352.5 ; C30.1@1095,2352.5 C30.1@1082.5,2352.5 ; v3(1310,2280) 1310,2352.5 C31.1@1350,2352.5 1390,2352.5 v3(1390,2280) ; L3.1@1437.75,2925 v3(1490,2925)
5V_MON: 5V2AD.P$1 5VMON.P$1 C45.1 R44.2 U17.16 | length 862.1
  Top w8: R44.2@1315,2095.47 1352.54,2096.46 1374,2075 1374,2020.53 C45.1@1374.53,2020 1420,2020 1450,2050 5VMON.P$1@1450,2125 ; U17.16@1776.64,2202 U17.16@1779,2202.36 1862.36,2202.36 1910,2250 5V2AD.P$1@1950,2250
  Top w10: v1(1750,2150) 1765,2165 1765,2202.36 U17.16@1779,2202.36
  Bottom w10: 5VMON.P$1@1450,2125 1500,2125 1525,2150 v1(1750,2150)
5V_OK: 5VOK.P$1 5VOK.P$2 R29.2 U5.2 U17.1 | length 1656.4
  Top w8: v1(805,2750) 825,2730 928,2730 940,2742 940,2770.47 U5.2@940.47,2770.94 ; v1(1124,2767) 1452,2767 1486,2801 1621,2801 1718.13,2703.87 R29.2@1718.13,2669 1718.13,2508.87 1729,2498 1778.64,2498 U17.1@1779,2497.64
  Top w10: 5VOK.P$2@700,2900 700,2790 740,2750 v1(805,2750)
  Bottom w8: v1(805,2750) 837,2782 1054,2782 1069,2767 v1(1124,2767)
5VPIC: 5VPIC.P$1 5VSENS.P$1 5VSENS.P$2 C4.1 C26.1 C41.1 C44.1 C46.1 C48.1 C50.1 C51.1 C52.1 C53.1 C77.1 C78.1 C79.1 PICKIT3.2 R1.1 R2.1 R3.1 R15.1 R26.2 R59.2 U6.5 U12.5 U12.6 U13.5 U13.6 U14.5 U14.6 U15.5 U15.6 U17.10 U17.19 U17.26 U17.38 U17.57 | length 7454.2
  Top w8: C51.1@1679.53,2255 C51.1@1686.5,2261.97 ; C50.1@1686.5,2320 1686.97,2320.47 U17.10@1779,2320.47 1899.53,2320.47 v1(1900,2320) ; U17.19@1891.73,2129 1891.73,2083.27 v1(1905,2070) ; C52.1@1988.5,2660 1990.16,2658.34 U17.57@1990.16,2571 1990.16,2485.16 v1(1990,2485) ; C53.1@1988.5,2718.03 C53.1@1995.47,2725 ; U17.26@2029.53,2129 2029.53,2050.03 C78.1@2034.5,2045 ; U17.38@2221,2300.79 2312.71,2300.79 C26.1@2313.5,2300 ; C77.1@2313.5,2241.97 C77.1@2320.47,2235
  Top w10: C46.1@1998.5,1385 1998.5,1456 U14.5@2000,1456 2000,1420 2037,1420 2037,1456 U14.6@2037.4,1456 ; v1(2029,1945) 2029,1956 2029.53,1984.47 C79.1@2026.53,1985 2026.53,1990.5 C79.1@2034,1997.97 ; 5VPIC.P$1@2100,2825 2135,2860 2190,2860 R26.2@2190,2854.53
  Top w12: C48.1@743.5,1735 743.5,1801 U15.5@745,1801 745,1765 782.4,1765 U15.6@782.4,1801 782.4,1785 v1(810,1785) ; R59.2@830,2632.87 867.13,2632.87 880,2620 880,2300 940,2240 940,2075 1000,2015 C44.1@1203.5,2015 ; v1(1175,1920) 1203.5,1948.5 C44.1@1203.5,2015 ; U13.6@1242.4,2081 1242.4,2044 1205,2044 U13.5@1205,2081 1205,2015 C44.1@1203.5,2015 ; C51.1@1686.5,2261.97 C50.1@1686.5,2320 ; PICKIT3.2@1700,1800 1700,1550 1740,1510 1740,1430 1785,1385 C46.1@1998.5,1385 ; R15.1@1792.13,1925 1865,1925 1870,1930 v1(1900,1930) ; v1(1835,2630) 1834.53,2630.47 C4.1@1834.53,2670 1842.4,2670 U6.5@1842.4,2748 1842.4,2735 1995.47,2735 C53.1@1995.47,2725 1995,2725.47 1995,2770 2050,2825 5VPIC.P$1@2100,2825 ; C52.1@1988.5,2660 C53.1@1988.5,2718.03 ; C79.1@2026.53,1985 C79.1@2029.5,1997.97 ; C79.1@2034,1997.97 2034,1999 2034.5,1999.5 C78.1@2034.5,2045 ; v1(2280,2142) 2280,2095 2305,2070 R2.1@2332.87,2070 R3.1@2332.87,2020 R1.1@2332.87,1970 ; v1(2310,2330) 2310,2300.79 C26.1@2312.71,2300.79 ; C77.1@2313.5,2241.97 C26.1@2313.5,2300 ; v1(3760,2395) 3760,2423.5 C41.1@3758.5,2425 3758.5,2496 U12.5@3760,2496 3760,2460 3797.4,2460 U12.6@3797.4,2496
  Top w16: C51.1@1675,2255 C51.1@1679.53,2255 C51.1@1680,2255
  GND+Signal w12: v1(1175,1920) 1230,1975 v1(1900,1975)
  PWR+Signal w12: v1(810,1785) 1040,1785 v1(1175,1920) ; v1(1835,2630) 1905,2560 v1(1905,2485)
  Bottom w12: PICKIT3.2@1700,1800 5VSENS.P$2@1700,1880 1745,1925 1865,1925 1870,1930 v1(1900,1930) ; v1(2325,2395) v1(3760,2395)
12V_MON: 12V2AD.P$1 12VMON.P$1 C49.1 R50.2 U17.17 | length 1588.3
  Top w8: v1(1750,2105) 1852.36,2105 U17.17@1852.36,2129 ; U17.17@1852,2128.64 U17.17@1852.36,2129 ; 12V2AD.P$1@2010,2250 1970,2210 1898,2210 1868,2180 1860,2180 1852.36,2172.36 U17.17@1852.36,2129
  Top w10: R50.2@860,1815.47 884.46,1816.46 900,1832 ; 12VMON.P$1@860,1955 900,1915 900,1832 ; C49.1@919.53,1750 919,1750.53 919,1785 900,1804 900,1832
  Bottom w10: 12VMON.P$1@860,1955 1550,1955 1700,2105 v1(1750,2105)
!5V_EN!: !5VEN.P$1 !5VEN.P$2 R60.1 U17.2 | length 1209.4
  Top w8: v1(1575,2570) 1618,2570 1710,2478 U17.2@1779,2477.95
  Top w10: R60.1@624,2536.87 624,2535 !5VEN.P$2@685,2535
  Bottom w10: !5VEN.P$2@685,2535 1540,2535 v1(1575,2570)
!12V_EN!: !12VEN.P$1 R63.1 U17.18 | length 1027
  Top w8: v1(1780,2060) 1805,2085 1864,2085 1872,2093 U17.18@1872.05,2129 U17.18@1872.05,2129
  Top w10: !12VEN.P$1@1510,1390 R63.1@1557.87,1390
  Bottom w10: !12VEN.P$1@1510,1390 1540,1420 1540,1915 1685,2060 v1(1780,2060)
!CHRGR_INT!: !INT!.P$2 R1.2 U1.11 U17.33 | length 1408.4
  Top w8: U17.33@2221,2202.36 2233,2202.36 2233,1971 2269,1935 2359,1935 2368,1944 2368,1969.13 R1.2@2367.13,1970 !INT!.P$2@2412,1970 ; U1.11@2847.75,1434.84 2877,1433 2877,1433.84 2899.84,1433.84 v1(2900,1434)
  Bottom w8: !INT!.P$2@2412,1970 2445,1937 2445,1635 2646,1434 v1(2900,1434)
$N36: C36.1 CR6.1 CR7.1 R35.2 U6.1 | length 1498.7
  Top w10: R35.2@1705,2857.13 1705,2882 1718,2895 v1(1840,2895) 1840,2843.4 U6.1@1842.4,2842
  Top w12: U6.1@1842.4,2842 1879,2842 1905.5,2815.5 C36.1@1906,2815.5 ; CR6.1@2775,2789.72 2775,2775 v1(2825,2775) 2850,2750 CR7.1@2919.72,2750
  Bottom w12: v1(1840,2895) 2345,2895 2465,2775 v1(2825,2775)
$N99: J1.2 R57.2 | length 301.3
  Top w45: J1.2@433.35,665 530,665 570,705 570,851.69 R57.2@571,852.69
BATT+: BATT+.P$1 C20.1 CR4.1 J3.4 R17.2 R18.2 R57.1 U1.8 | length 1441.6
  Top w12: U1.8@2572.25,1486.02 2643.98,1486.02 2740,1390 3300,1390 3405,1495 CR4.1@3405,1576.88
  Top w30: CR4.1@3405,1576.88 3408.12,1580 v3(3495,1580) ; v3(3585,1580) 3663.23,1580 C20.1@3668.23,1585 ; R17.2@3695,1766.89 3700,1761.89 v3(3700,1700) ; v3(3890,1700) R18.2@3890,1766.89
  Top w45: BATT+.P$1@440,940 440.69,939.31 R57.1@571,939.31
BATT-: J1.1 R19.2 | length 341.3
  Top w30: R19.2@71.69,850 R19.2@75,846.69 ; 140,665 145,665
  Top w45: R19.2@75,846.69 75,730 140,665 ; 145,665 J1.1@268,665
BATT_THERM+: J1.3 R4.1 R9.2 THERM+.P$1 | length 3853.9
  Top w10: R4.1@2972.13,1460 2995,1460 ; v1(3005,1425) 3005,1450 2995,1460 ; R9.2@3032.87,1460 2995,1460
  Top w20: THERM+.P$1@265,275 265,351 268,354 J1.3@268,499.65
  GND+Signal w20: v1(3005,1325) v1(3005,1425)
  Bottom w20: J1.3@268,499.65 350.35,582 572,582 675,685 675,1260 715,1300 2330,1300 2345,1285 2965,1285 v1(3005,1325)
BUFFOUT1: R41.1 U12.1 U12.4 | length 292.6
  Top w10: v1(3690,2495) 3721.6,2495 U12.4@3722.6,2496 ; U12.1@3797.4,2584 3821,2584 v1(3835,2570) 3873.54,2570 R41.1@3875,2569.53
  Bottom w10: v1(3690,2495) 3760,2495 v1(3835,2570)
BUFFOUT2: R47.1 U14.1 U14.4 | length 332.5
  Top w10: v1(1935,1440) 1962.6,1440 U14.4@1962.6,1456 ; U14.1@2037.4,1544 2037.4,1525 2035,1525 2035,1530 v1(2070,1530) 2110,1530 2110,1525 2106.46,1525 R47.1@2110,1529.53
  Bottom w10: v1(1935,1440) 1935,1441.6 1936.6,1441.6 2025,1530 v1(2070,1530)
BUFFOUT3: R44.1 U13.1 U13.4 | length 313.3
  Top w10: v1(1140,2061) 1167.6,2061 U13.4@1167.6,2081 ; U13.1@1242.4,2169 1242.4,2150 v1(1275,2150) 1311.46,2150 R44.1@1315,2154.53
  Bottom w10: v1(1140,2061) 1186,2061 v1(1275,2150)
BUFFOUT4: R50.1 U15.1 U15.4 | length 305.2
  Top w10: v1(680,1785) 708,1785 708,1790 707.6,1790 U15.4@707.6,1801 ; U15.1@782.4,1889 806,1889 v1(820,1875) 858.54,1875 R50.1@860,1874.53
  Bottom w10: v1(680,1785) 730,1785 v1(820,1875)
CHRGR_SCL: R2.2 SCL.P$2 U1.13 U17.34 | length 1289.8
  Top w8: U17.34@2221,2222.05 2257.95,2222.05 2265,2215 2265,2200 2365,2100 2365,2072.13 R2.2@2367.13,2070 ; R2.2@2369.13,2072 SCL.P$2@2412,2072 ; U1.13@2847.75,1486.02 2848.77,1485 2876,1485 2876,1487 v1(2900,1487)
  Top w10: R2.2@2367.13,2070 R2.2@2369.13,2072
  Bottom w8: SCL.P$2@2412,2072 2470,2014 2470,1930 2470,1640 2630,1480 2865,1480 2872,1487 v1(2900,1487)